# Altium PCB 1H-WSL007-2-1.PcbDoc (part 4 of 4)
Units mil, origin at the board's own origin, x right, y up, seen from the top; angles counter-clockwise.
Board outline 6030 x 4220 mil, 4 copper layers (Top Layer, Mid-Layer 1, Mid-Layer 2, Bottom Layer), stack 90.192 mil thick; 369 components, 15 nets, 801 pads, 1963 vias.
Unrouted connection lines stored in the file: 45.
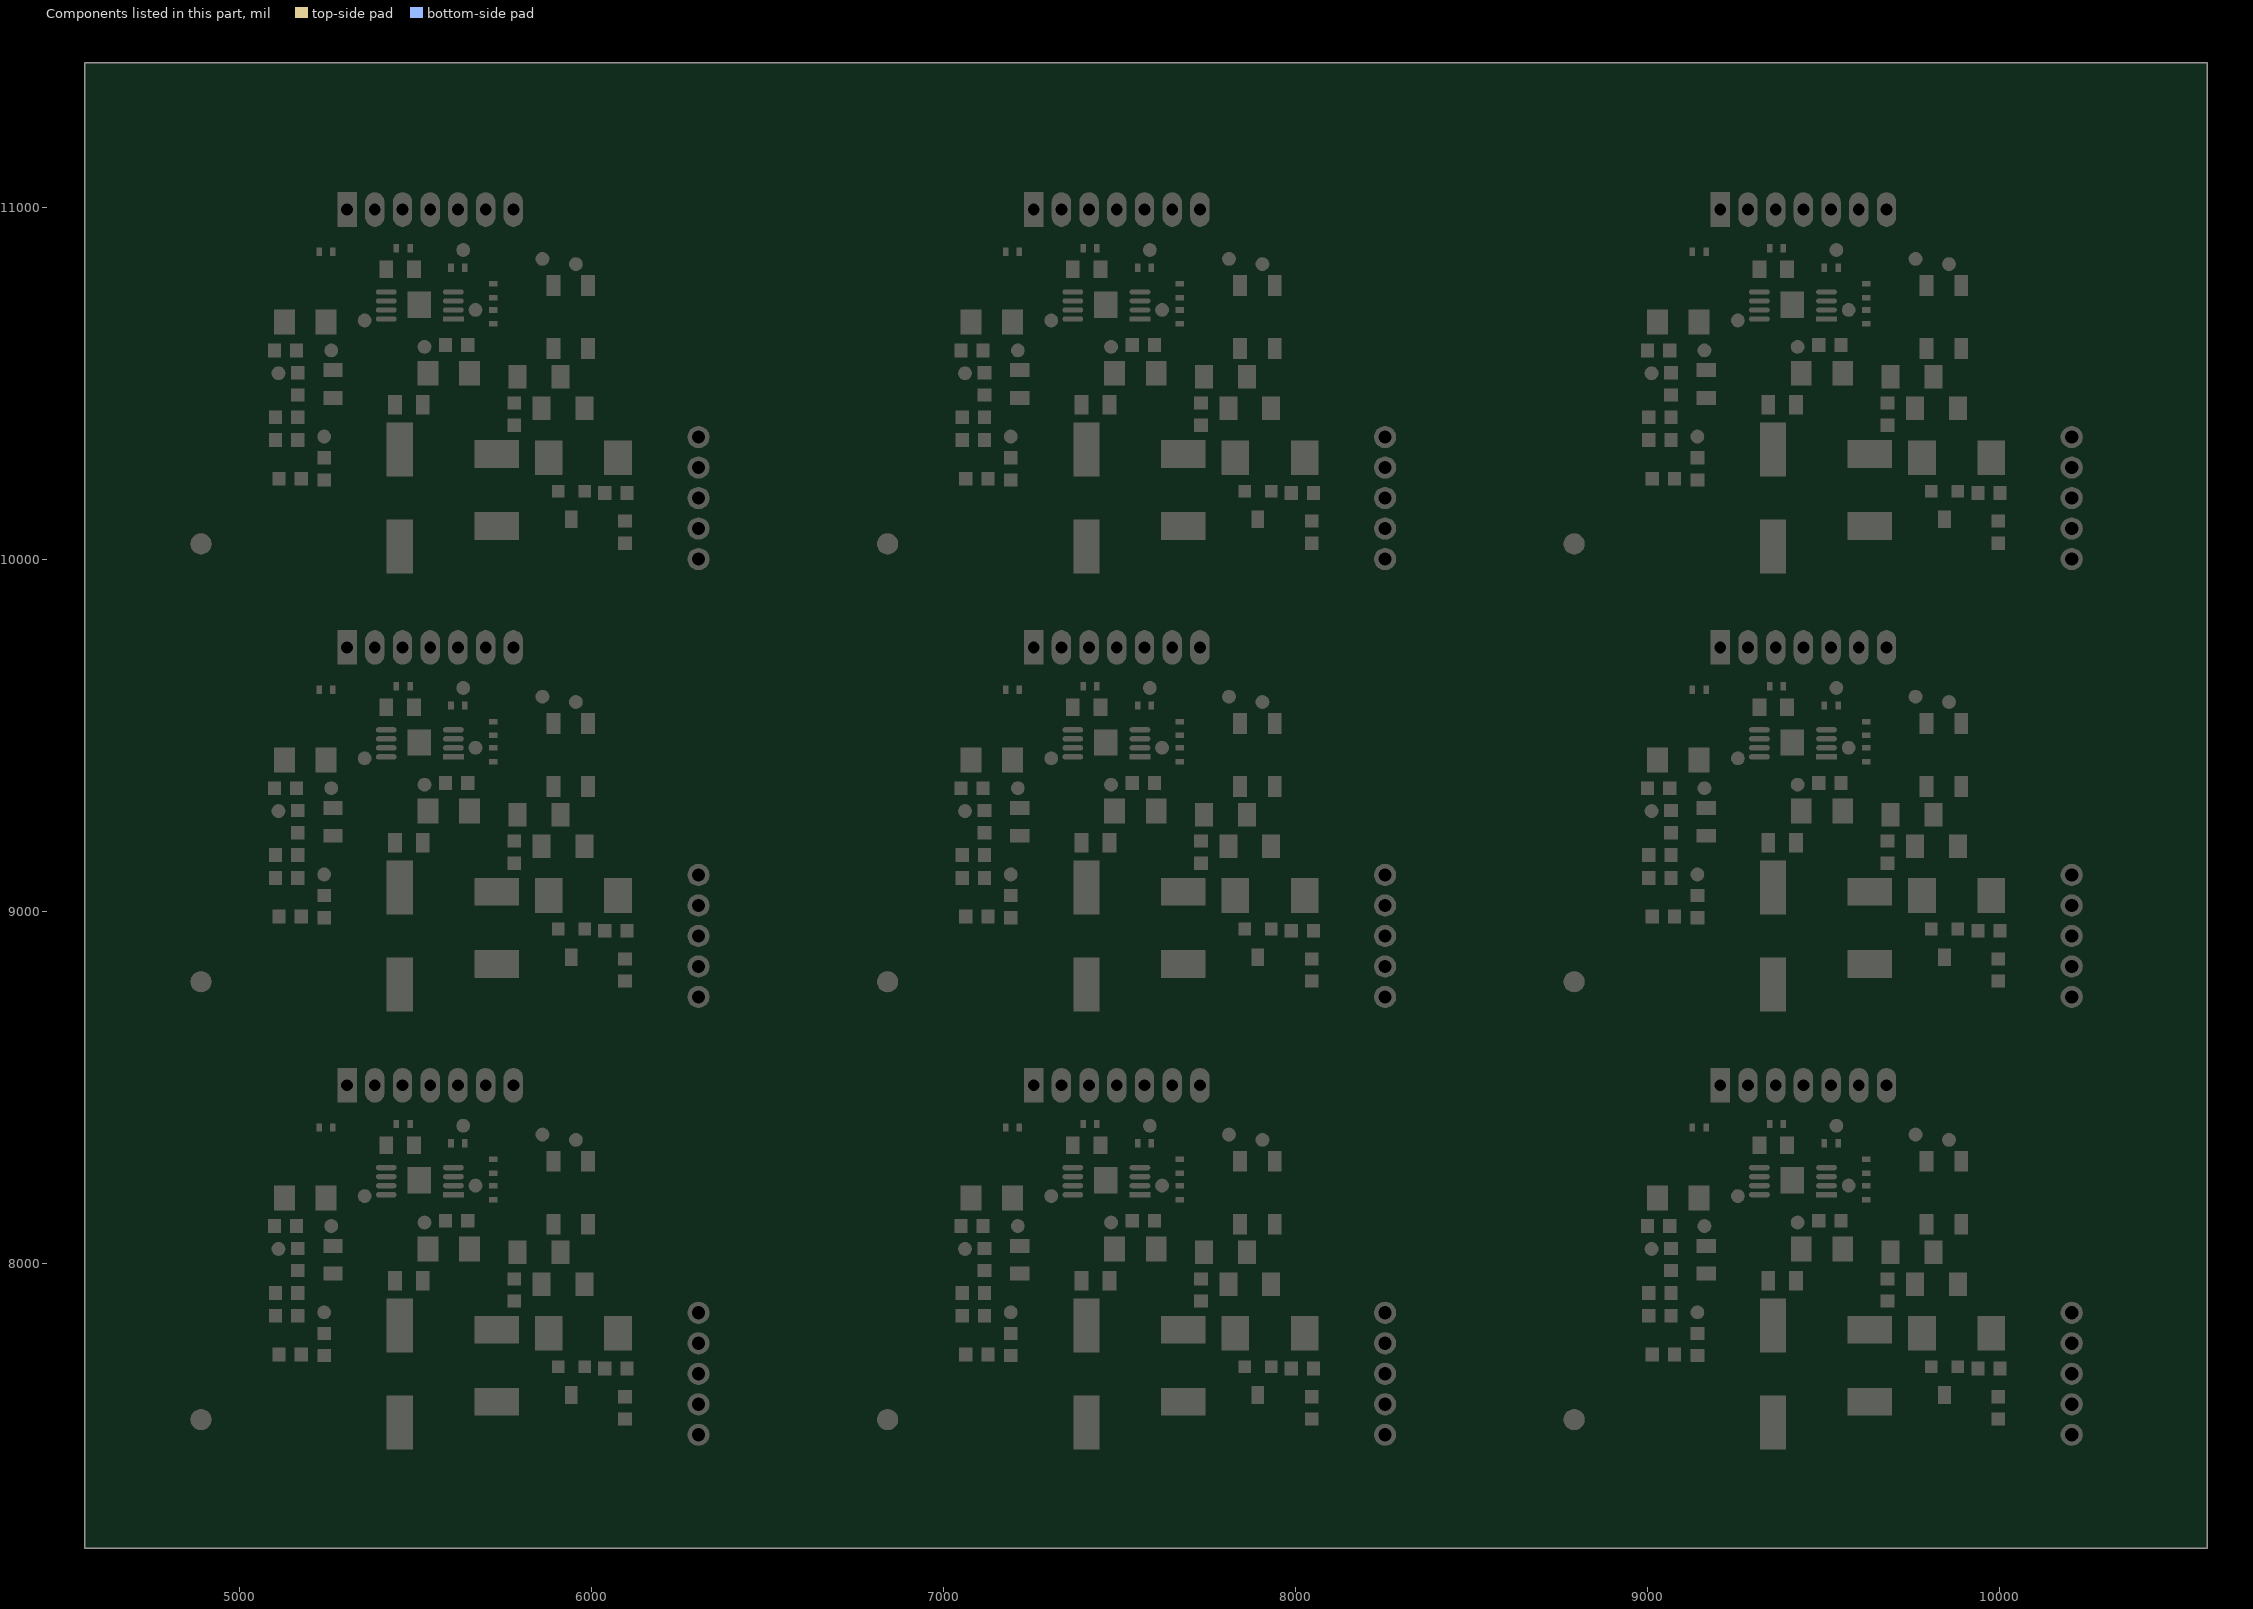
[diagram p6: the components of this part, seen from the top]

## Polygon pours and split planes (outlines as drawn) (continued)
no net on Mid-Layer 2 "Layer2-GND" (solid, remove dead copper, pour order 40): 6671.65,7531.74 ccw(c6789.77,7531.74) 6789.77,7413.63 8344.88,7413.63 8344.88,7417.57 cw(c8386.22,7417.57) 8427.56,7417.57 8427.56,7413.63 8504.33,7413.63 ccw(c8504.33,7453) 8543.7,7453 8543.7,7976.62 ccw(c8504.33,7976.62) 8504.33,8015.99 8417.72,8015.99 8417.72,7943.16 cw(c8386.22,7943.16) 8354.73,7943.16 8354.73,8015.99 8122.44,8015.99 cw(c8122.44,8055.36) 8083.07,8055.36 8083.07,8539.61 ccw(c7964.96,8539.61) 7964.96,8657.72 6789.77,8657.72 ccw(c6789.77,8539.61) 6671.65,8539.61
no net on Mid-Layer 2 "Layer2-GND" (solid, remove dead copper, pour order 32): 8622.44,7531.74 ccw(c8740.55,7531.74) 8740.55,7413.63 10295.67,7413.63 10295.67,7417.57 cw(c10337.01,7417.57) 10378.35,7417.57 10378.35,7413.63 10455.12,7413.63 ccw(c10455.12,7453) 10494.49,7453 10494.49,7976.62 ccw(c10455.12,7976.62) 10455.12,8015.99 10368.5,8015.99 10368.5,7943.16 cw(c10337.01,7943.16) 10305.51,7943.16 10305.51,8015.99 10073.23,8015.99 cw(c10073.23,8055.36) 10033.86,8055.36 10033.86,8539.61 ccw(c9915.75,8539.61) 9915.75,8657.72 8740.55,8657.72 ccw(c8740.55,8539.61) 8622.44,8539.61

## Keep-outs
Keep-Out Layer:
  circle w0.5: c8921.65,10098.67 r29.53
  circle w0.5: c10376.38,10173.47 r49.21
  circle w0.5: c9846.85,10010.08 r49.21
  circle w0.5: c8779.92,10870.32 r49.21
  circle w0.5: c8921.65,8854.57 r29.53
  circle w0.5: c10376.38,8929.38 r49.21
  circle w0.5: c9846.85,8765.99 r49.21
  circle w0.5: c8779.92,9626.23 r49.21
  circle w0.5: c6970.86,10098.67 r29.53
  circle w0.5: c8425.59,10173.47 r49.21
  circle w0.5: c7896.06,10010.08 r49.21
  circle w0.5: c6829.14,10870.32 r49.21
  circle w0.5: c6970.86,8854.57 r29.53
  circle w0.5: c8425.59,8929.38 r49.21
  circle w0.5: c7896.06,8765.99 r49.21
  circle w0.5: c6829.14,9626.23 r49.21
  circle w0.5: c5020.08,10098.67 r29.53
  circle w0.5: c6474.8,10173.47 r49.21
  circle w0.5: c5945.28,10010.08 r49.21
  circle w0.5: c4878.35,10870.32 r49.21
  circle w0.5: c5020.08,8854.57 r29.53
  circle w0.5: c6474.8,8929.38 r49.21
  circle w0.5: c5945.28,8765.99 r49.21
  circle w0.5: c4878.35,9626.23 r49.21
  circle w0.5: c5020.08,7610.48 r29.53
  circle w0.5: c6474.8,7685.28 r49.21
  circle w0.5: c5945.28,7521.9 r49.21
  circle w0.5: c4878.35,8382.13 r49.21
  circle w0.5: c6970.86,7610.48 r29.53
  circle w0.5: c8425.59,7685.28 r49.21
  circle w0.5: c7896.06,7521.9 r49.21
  circle w0.5: c6829.14,8382.13 r49.21
  circle w0.5: c8921.65,7610.48 r29.53
  circle w0.5: c10376.38,7685.28 r49.21
  circle w0.5: c9846.85,7521.9 r49.21
  circle w0.5: c8779.92,8382.13 r49.21
  lines w0.5: 5924.67,8523.87 cw(c5954.17,8525.27) 5932.66,8545.5 ; 5924.67,9767.96 cw(c5954.17,9769.37) 5932.66,9789.59 ; 5924.67,11012.05 cw(c5954.17,11013.46) 5932.66,11033.69 ; 7875.46,8523.87 cw(c7904.96,8525.27) 7883.44,8545.5 ; 7875.46,9767.96 cw(c7904.96,9769.37) 7883.44,9789.59 ; 7875.46,11012.05 cw(c7904.96,11013.46) 7883.44,11033.69 ; 9826.25,8523.87 cw(c9855.74,8525.27) 9834.23,8545.5 ; 9826.25,9767.96 cw(c9855.74,9769.37) 9834.23,9789.59 ; 9826.25,11012.05 cw(c9855.74,11013.46) 9834.23,11033.69 ; 17616.77,7863.63 17616.77,7867.57 ccw(c17575.43,7867.57) 17534.1,7867.57 17534.1,7863.63 15978.98,7863.63 15860.87,7863.63 15860.87,7745.51 21634.49,7745.51 21634.49,7863.63 21595.12,7863.63 ; 17693.54,7863.63 17929.77,7863.63 ; 19484.88,7863.63 19484.88,7867.57 cw(c19526.22,7867.57) 19567.56,7867.57 19567.56,7863.63 19644.33,7863.63 19880.55,7863.63 ; 21435.67,7863.63 21435.67,7867.57 cw(c21477.01,7867.57) 21518.35,7867.57 21518.35,7863.63 21595.12,7863.63 ; 21634.49,7903 cw(c21595.12,7903) 21595.12,7863.63 ; 4838.98,7413.63 cw(c4838.98,7531.74) 4720.87,7531.74 4720.87,8539.61 cw(c4838.98,8539.61) 4838.98,8657.72 ; 4838.98,7413.63 6394.1,7413.63 ; 4838.98,7413.63 4720.87,7413.63 4720.87,7295.51 10494.49,7295.51 10494.49,7413.63 10455.12,7413.63 ; 4838.98,8657.72 cw(c4838.98,8775.83) 4720.87,8775.83 4720.87,9783.71 cw(c4838.98,9783.71) 4838.98,9901.82 ; 4838.98,8657.72 6394.1,8657.72 6394.1,8661.66 cw(c6435.43,8661.66) 6476.77,8661.66 6476.77,8657.72 6553.54,8657.72 ccw(c6553.54,8697.09) 6592.91,8697.09 6592.91,9220.71 ccw(c6553.54,9220.71) 6553.54,9260.09 6466.93,9260.08 6466.93,9187.25 cw(c6435.43,9187.25) 6403.94,9187.25 6403.94,9260.08 6171.65,9260.08 cw(c6171.65,9299.45) 6132.28,9299.45 6132.28,9421.5 6132.28,9453 6132.28,9653.54 6132.28,9748.27 6132.28,9783.71 ccw(c6014.17,9783.71) 6014.17,9901.82 4838.98,9901.82 ; 4838.98,8657.72 6014.17,8657.72 cw(c6014.17,8539.61) 6132.28,8539.61 6132.28,8504.18 6132.28,8409.44 6132.28,8208.9 6132.28,8177.41 6132.28,8055.36 ccw(c6171.65,8055.36) 6171.65,8015.99 6403.94,8015.99 6403.94,7943.16 ccw(c6435.43,7943.16) 6466.93,7943.16 6466.93,8015.99 6553.54,8015.99 cw(c6553.54,7976.62) 6592.91,7976.62 6592.91,7453 cw(c6553.54,7453) 6553.54,7413.63 ; 4838.98,9901.82 cw(c4838.98,10019.93) 4720.87,10019.93 4720.87,11027.8 cw(c4838.98,11027.8) 4838.98,11145.91 ; 4838.98,9901.82 6394.1,9901.82 6394.1,9905.75 cw(c6435.43,9905.75) 6476.77,9905.75 6476.77,9901.82 6553.54,9901.82 ccw(c6553.54,9941.19) 6592.91,9941.19 6592.91,10464.81 ccw(c6553.54,10464.81) 6553.54,10504.18 6466.93,10504.18 6466.93,10431.34 cw(c6435.43,10431.34) 6403.94,10431.34 6403.94,10504.18 6171.65,10504.18 cw(c6171.65,10543.55) 6132.28,10543.55 6132.28,10665.59 6132.28,10697.09 6132.28,10897.63 6132.28,10992.37 6132.28,11027.8 ccw(c6014.17,11027.8) 6014.17,11145.91 ; 4838.98,11145.91 6014.17,11145.91 ; 4838.98,11145.91 4720.87,11145.91 4720.87,11264.03 10494.49,11264.03 10494.49,11145.91 9915.75,11145.91 ; 4838.98,11145.91 6014.17,11145.91 ; 5932.65,8545.5 ccw(c5954.17,8525.27) 5975.68,8505.05 6002.65,8533.73 ccw(c5981.14,8553.95) 5959.62,8574.18 5932.65,8545.5 ; 5932.65,9789.59 ccw(c5954.17,9769.37) 5975.68,9749.14 6002.65,9777.82 ccw(c5981.14,9798.05) 5959.62,9818.27 5932.65,9789.59 ; 5932.65,11033.68 ccw(c5954.17,11013.46) 5975.68,10993.23 6002.65,11021.92 ccw(c5981.14,11042.14) 5959.62,11062.37 5932.65,11033.68 ; 6014.17,11145.91 6789.77,11145.91 ; 6394.1,7413.63 6394.1,7417.57 ; 6394.1,7413.63 6394.1,7417.57 ; 6394.1,7417.57 cw(c6435.43,7417.57) 6476.77,7417.57 ; 6394.1,7417.57 cw(c6435.43,7417.57) 6476.77,7417.57 ; 6476.77,7413.63 6553.54,7413.63 ; 6476.77,7413.63 6476.77,7417.57 ; 6476.77,7413.63 6476.77,7417.57 ; 6553.54,7413.63 6789.77,7413.63 ; 6789.77,7413.63 cw(c6789.77,7531.74) 6671.65,7531.74 6671.65,8539.61 cw(c6789.77,8539.61) 6789.77,8657.72 ; 6789.77,7413.63 8344.88,7413.63 ; 6789.77,8657.72 cw(c6789.77,8775.83) 6671.65,8775.83 6671.65,9783.71 cw(c6789.77,9783.71) 6789.77,9901.82 ; 6789.77,8657.72 8344.88,8657.72 8344.88,8661.66 cw(c8386.22,8661.66) 8427.56,8661.66 8427.56,8657.72 8504.33,8657.72 ccw(c8504.33,8697.09) 8543.7,8697.09 8543.7,9220.72 ccw(c8504.33,9220.72) 8504.33,9260.09 8417.72,9260.09 8417.72,9187.25 cw(c8386.22,9187.25) 8354.73,9187.25 8354.73,9260.09 8122.44,9260.09 cw(c8122.44,9299.46) 8083.07,9299.46 8083.07,9421.5 8083.07,9453 8083.07,9653.54 8083.07,9748.27 8083.07,9783.71 ccw(c7964.96,9783.71) 7964.96,9901.82 6789.77,9901.82 ; 6789.77,8657.72 7964.96,8657.72 cw(c7964.96,8539.61) 8083.07,8539.61 8083.07,8504.18 8083.07,8409.44 8083.07,8208.9 8083.07,8177.41 8083.07,8055.36 ccw(c8122.44,8055.36) 8122.44,8015.99 8354.73,8015.99 8354.73,7943.16 ccw(c8386.22,7943.16) 8417.72,7943.16 8417.72,8015.99 8504.33,8015.99 cw(c8504.33,7976.62) 8543.7,7976.62 8543.7,7453 cw(c8504.33,7453) 8504.33,7413.63 ; 6789.77,9901.82 cw(c6789.77,10019.93) 6671.65,10019.93 6671.65,11027.8 cw(c6789.77,11027.8) 6789.77,11145.91 ; 6789.77,9901.82 8344.88,9901.82 8344.88,9905.75 cw(c8386.22,9905.75) 8427.56,9905.75 8427.56,9901.82 8504.33,9901.82 ccw(c8504.33,9941.19) 8543.7,9941.19 8543.7,10464.81 ccw(c8504.33,10464.81) 8504.33,10504.18 8417.72,10504.18 8417.72,10431.34 cw(c8386.22,10431.34) 8354.73,10431.34 8354.73,10504.18 8122.44,10504.18 cw(c8122.44,10543.55) 8083.07,10543.55 8083.07,10665.59 8083.07,10697.09 8083.07,10897.63 8083.07,10992.37 8083.07,11027.8 ccw(c7964.96,11027.8) 7964.96,11145.91 ; 6789.77,11145.91 7964.96,11145.91 ; 6789.77,11145.91 7964.96,11145.91 ; 7883.44,8545.5 ccw(c7904.95,8525.27) 7926.47,8505.05 7953.43,8533.73 ccw(c7931.92,8553.95) 7910.41,8574.18 7883.44,8545.5 ; 7883.44,9789.59 ccw(c7904.95,9769.37) 7926.47,9749.14 7953.43,9777.82 ccw(c7931.92,9798.05) 7910.41,9818.27 7883.44,9789.59 ; 7883.44,11033.69 ccw(c7904.95,11013.46) 7926.47,10993.23 7953.43,11021.92 ccw(c7931.92,11042.14) 7910.41,11062.37 7883.44,11033.68 ; 7964.96,11145.91 8740.55,11145.91 ; 8344.88,7413.63 8344.88,7417.57 ; 8344.88,7413.63 8344.88,7417.57 ; 8344.88,7417.57 cw(c8386.22,7417.57) 8427.56,7417.57 ; 8344.88,7417.57 cw(c8386.22,7417.57) 8427.56,7417.57 ; 8427.56,7413.63 8504.33,7413.63 ; 8427.56,7413.63 8427.56,7417.57 ; 8427.56,7413.63 8427.56,7417.57 ; 8427.56,7413.63 8504.33,7413.63 ; 8504.33,7413.63 8740.55,7413.63 ; 8740.55,7413.63 cw(c8740.55,7531.74) 8622.44,7531.74 8622.44,8539.61 cw(c8740.55,8539.61) 8740.55,8657.72 ; 8740.55,7413.63 10295.67,7413.63 ; 8740.55,8657.72 cw(c8740.55,8775.83) 8622.44,8775.83 8622.44,9783.71 cw(c8740.55,9783.71) 8740.55,9901.82 ; 8740.55,8657.72 10295.67,8657.72 10295.67,8661.66 cw(c10337.01,8661.66) 10378.35,8661.66 10378.35,8657.72 10455.12,8657.72 ccw(c10455.12,8697.09) 10494.49,8697.09 10494.49,9220.72 ccw(c10455.12,9220.72) 10455.12,9260.09 10368.5,9260.09 10368.5,9187.25 cw(c10337.01,9187.25) 10305.51,9187.25 10305.51,9260.09 10073.23,9260.09 cw(c10073.23,9299.46) 10033.86,9299.46 10033.86,9421.5 10033.86,9453 10033.86,9653.54 10033.86,9748.27 10033.86,9783.71 ccw(c9915.75,9783.71) 9915.75,9901.82 8740.55,9901.82 ; 8740.55,8657.72 9915.75,8657.72 cw(c9915.75,8539.61) 10033.86,8539.61 10033.86,8504.18 10033.86,8409.44 10033.86,8208.9 10033.86,8177.41 10033.86,8055.36 ccw(c10073.23,8055.36) 10073.23,8015.99 10305.51,8015.99 10305.51,7943.16 ccw(c10337.01,7943.16) 10368.5,7943.16 10368.5,8015.99 10455.12,8015.99 cw(c10455.12,7976.62) 10494.49,7976.62 10494.49,7453 ; 8740.55,9901.82 cw(c8740.55,10019.93) 8622.44,10019.93 8622.44,11027.8 cw(c8740.55,11027.8) 8740.55,11145.91 ; 8740.55,9901.82 10295.67,9901.82 10295.67,9905.75 cw(c10337.01,9905.75) 10378.35,9905.75 10378.35,9901.82 10455.12,9901.82 ccw(c10455.12,9941.19) 10494.49,9941.19 10494.49,10464.81 ccw(c10455.12,10464.81) 10455.12,10504.18 10368.5,10504.18 10368.5,10431.34 cw(c10337.01,10431.34) 10305.51,10431.34 10305.51,10504.18 10073.23,10504.18 cw(c10073.23,10543.55) 10033.86,10543.55 10033.86,10665.59 10033.86,10697.09 10033.86,10897.63 10033.86,10992.37 10033.86,11027.8 ccw(c9915.75,11027.8) 9915.75,11145.91 ; 8740.55,11145.91 9915.75,11145.91 ; 8740.55,11145.91 9915.75,11145.91 ; 9834.23,8545.5 ccw(c9855.74,8525.27) 9877.25,8505.05 9904.22,8533.73 ccw(c9882.71,8553.95) 9861.2,8574.18 9834.23,8545.5 ; 9834.23,9789.59 ccw(c9855.74,9769.37) 9877.25,9749.14 9904.22,9777.82 ccw(c9882.71,9798.05) 9861.2,9818.27 9834.23,9789.59 ; 9834.23,11033.69 ccw(c9855.74,11013.46) 9877.25,10993.23 9904.22,11021.92 ccw(c9882.71,11042.14) 9861.2,11062.37 9834.23,11033.68 ; 9915.75,11145.91 9915.75,11145.91 ; 10295.67,7413.63 10295.67,7417.57 ; 10295.67,7413.63 10295.67,7417.57 ; 10295.67,7417.57 cw(c10337.01,7417.57) 10378.35,7417.57 ; 10295.67,7417.57 cw(c10337.01,7417.57) 10378.35,7417.57 ; 10378.35,7413.63 10455.12,7413.63 ; 10378.35,7413.63 10378.35,7417.57 ; 10378.35,7413.63 10378.35,7417.57 ; 10378.35,7413.63 10455.12,7413.63 ; 10455.12,7413.63 ccw(c10455.12,7453) 10494.49,7453 ; 10455.12,7413.63 ccw(c10455.12,7453) 10494.49,7453 ; 21055.75,11595.91 19880.55,11595.91 19104.96,11595.91 17929.77,11595.91 17154.17,11595.91 15978.98,11595.91 15860.87,11595.91 15860.87,11714.03 21634.49,11714.03 21634.49,11595.91 21055.75,11595.91 ; 21055.75,11595.91 21055.75,11595.91

## Other copper
Top Layer:
  pour cut-out: 9763.96,10738.29 9763.96,10637.21 9920.76,10637.21 9920.76,10738.29
  pour cut-out: 9763.96,9494.2 9763.96,9393.12 9920.76,9393.12 9920.76,9494.2
  pour cut-out: 7813.18,10738.29 7813.18,10637.21 7969.97,10637.21 7969.97,10738.29
  pour cut-out: 7813.18,9494.2 7813.18,9393.12 7969.97,9393.12 7969.97,9494.2
  pour cut-out: 5862.39,10738.29 5862.39,10637.21 6019.19,10637.21 6019.19,10738.29
  pour cut-out: 5862.39,9494.2 5862.39,9393.12 6019.19,9393.12 6019.19,9494.2
  pour cut-out: 5862.39,8250.11 5862.39,8149.03 6019.19,8149.03 6019.19,8250.11
  pour cut-out: 7813.18,8250.11 7813.18,8149.03 7969.97,8149.03 7969.97,8250.11
  pour cut-out: 9763.96,8250.11 9763.96,8149.03 9920.76,8149.03 9920.76,8250.11

## Silkscreen, mask and mechanical layers (free items; w line width, h text height)
Bottom Overlay:
  text "2026.5.23" at 5855,10263.19 h160
  text "2026.5.23" at 7805.79,10263.19 h160
  text "2026.5.23" at 9756.57,10263.19 h160
  text "1H-WSL007-2-1" at 6135,10128.19 h160
  text "1H-WSL007-2-1" at 8085.79,10128.19 h160
  text "1H-WSL007-2-1" at 10036.57,10128.19 h160
  text "2026.5.23" at 5855,9019.09 h160
  text "2026.5.23" at 7805.79,9019.09 h160
  text "2026.5.23" at 9756.57,9019.09 h160
  text "1H-WSL007-2-1" at 6135,8884.09 h160
  text "1H-WSL007-2-1" at 8085.79,8884.09 h160
  text "1H-WSL007-2-1" at 10036.57,8884.09 h160
  text "2026.5.23" at 5855,7775 h160
  text "2026.5.23" at 7805.79,7775 h160
  text "2026.5.23" at 9756.57,7775 h160
  text "1H-WSL007-2-1" at 6135,7640 h160
  text "1H-WSL007-2-1" at 8085.79,7640 h160
  text "1H-WSL007-2-1" at 10036.57,7640 h160
Top Solder:
  drawing of 225 lines, arcs and shapes, not listed
Bottom Solder:
  drawing of 216 lines, arcs and shapes, not listed
Mechanical 1:
  drawing of 2065 lines, arcs and shapes, not listed
Mechanical 2:
  drawing of 480 lines, arcs and shapes, not listed

## Text inside footprints (layer, text, board x,y; h text height)
1: Bottom Overlay "二维码" at 9030.91,10348.47 h36 r90
1: Bottom Overlay "二维码" at 9030.91,9104.37 h36 r90
1: Bottom Overlay "二维码" at 7080.12,10348.47 h36 r90
1: Bottom Overlay "二维码" at 7080.12,9104.37 h36 r90
1: Bottom Overlay "二维码" at 5129.34,10348.46 h36 r90
1: Bottom Overlay "二维码" at 5129.34,9104.37 h36 r90
1: Bottom Overlay "二维码" at 5129.34,7860.28 h36 r90
1: Bottom Overlay "二维码" at 7080.12,7860.28 h36 r90
1: Bottom Overlay "二维码" at 9030.91,7860.28 h36 r90